# Altium PCB BB_Production.PcbDoc (part 2 of 2)
Units mil, origin at the board's own origin, x right, y up, seen from the top; angles counter-clockwise.
Board outline 3937.01 x 2125.99 mil, 2 copper layers (Top Layer, Bottom Layer), stack 61.811 mil thick; 78 components, 59 nets, 221 pads, 81 vias.
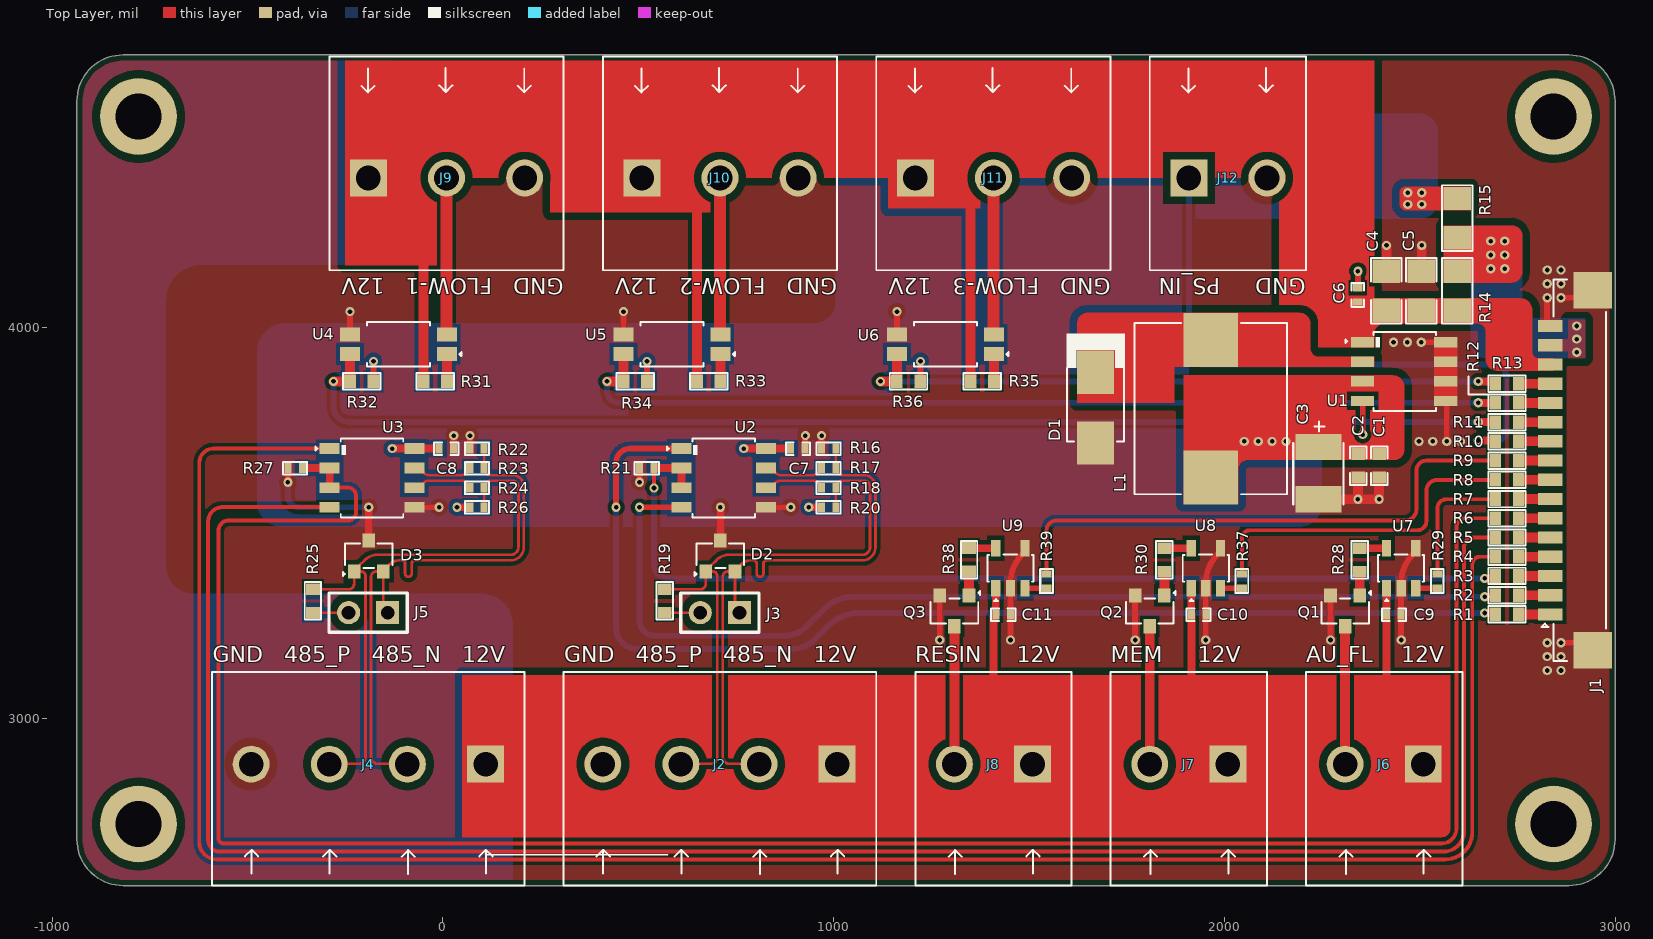
[diagram p0: Top Layer view]

## Part data (continued)
R17 R18 R23 R24: library part RC0402FR-070RL, "RES 0 OHM JUMPER 1/16W 0402", Case Code (Imperial)=0402, Case Code (Metric)=1005, LCSC Part Number=C106231, Manufacturer=Yageo, Max Operating Temperature=155°C, Max Power Dissipation=63mW, Min Operating Temperature=-55°C, Power Rating=62.5mW, Resistor Type="Thick Film", Supplier Part Number 1=603-RC0402FR-070RL, Temperature Coefficient=200ppm/°C, Tolerance=1%, Voltage Rating=50V, Case/Package=0402, ComponentLink1Description=https://datasheet.ciiva.com/8896/pyu-rc0402-51-rohs-l-6-8896149.pdf?src-supplier=Avnet, ComponentLink1URL=https://datasheet.ciiva.com/8896/pyu-rc0402-51-rohs-l-6-8896149.pdf?src-supplier=Avnet, ComponentLink2Description=https://datasheet.ciiva.com/16790/pyu-rc0402-51-rohs-l-6-r-16790444.pdf?src-supplier=Future+Electronics, ComponentLink2URL=https://datasheet.ciiva.com/16790/pyu-rc0402-51-rohs-l-6-r-16790444.pdf?src-supplier=Future+Electronics, Contact Plating=Tin,Matte, Features="Moisture Resistant", Height=0.35mm, Item Type=Resistors, Lead Free="Lead Free", Length=1mm, Manufacturer Part Number=RC0402FR-070RL, Mount="Surface Mount", Number of Terminations=2, Packaging="Tape and Reel", Pricing 1="1=0.10000, 10=0.01400, 50=0.01400, 100=0.00600, 1000=0.00300, 5000=0.00200, 10000=0.00100 (USD)", Radiation Hardening=No, Resistance=0R, RoHS=Yes, RoHS Compliant=Yes, Series=RC, Size Code=0402, Stock 1=8556842, Supplier 1=Mouser, Termination=SMD/SMT, Width=0.5mm
R19 R25: library part RC0603FR-07120RL, "RES 120 OHM 1% 1/10W 0603", Case Code (Imperial)=0603, Case Code (Metric)=1608, LCSC Part Number=C114640, Manufacturer=Yageo, Max Operating Temperature=155°C, Max Power Dissipation=100mW, Min Operating Temperature=-55°C, Package Quantity=1, Resistance Tolerance=1%, Resistor Type="Thick Film", Supplier Part Number 1=311-120HRCT-ND, Temperature Coefficient=100ppm/°C, Voltage Rating=50V, Case/Package=0603, Category="Chip SMD Resistors", ComponentLink1Description=https://datasheet.ciiva.com/2553/pyu-r-int-thick-7-2553512.pdf?src-supplier=Digi-Key, ComponentLink1URL=https://datasheet.ciiva.com/2553/pyu-r-int-thick-7-2553512.pdf?src-supplier=Digi-Key, ComponentLink2Description=https://datasheet.ciiva.com/7746/443971-7746248.pdf?src-supplier=Element14, ComponentLink2URL=https://datasheet.ciiva.com/7746/443971-7746248.pdf?src-supplier=Element14, ComponentLink3Description=https://datasheet.ciiva.com/2553/pyu-r-int-thick-7-2553513.pdf?src-supplier=Digi-Key, ComponentLink3URL=https://datasheet.ciiva.com/2553/pyu-r-int-thick-7-2553513.pdf?src-supplier=Digi-Key, ComponentLink4Description=https://datasheet.ciiva.com/7746/443971-7746249.pdf?src-supplier=Element14, ComponentLink4URL=https://datasheet.ciiva.com/7746/443971-7746249.pdf?src-supplier=Element14, ComponentLink5Description=https://datasheet.ciiva.com/2553/pyu-r-int-thick-7-2553514.pdf?src-supplier=Digi-Key, ComponentLink5URL=https://datasheet.ciiva.com/2553/pyu-r-int-thick-7-2553514.pdf?src-supplier=Digi-Key, ComponentLink6Description=https://datasheet.ciiva.com/46395/443971-46395021.pdf?src-supplier=Element14, ComponentLink6URL=https://datasheet.ciiva.com/46395/443971-46395021.pdf?src-supplier=Element14, Construction=Rectangular, Depth=0.8mm, Features="Moisture Resistant", Height=0.022inch, Item Type=Resistor, Lead Free="Lead Free", Length=1.6mm, Manufacturer Part Number=RC0603FR-07120RL, Military Standard=Not, Number of Pins=2, Number of Terminations=2, Packaging="Tape and Reel", Power Rating=100mW, Pricing 1="1=0.10000, 10=0.02400, 100=0.00970, 1000=0.00436, 2500=0.00378 (USD)", REACH SVHC="No SVHC", Resistance=120R, RoHS=Yes, RoHS Compliant=Yes, Series=RC, Size Code=0603, Stock 1=839061, Supplier 1=Digi-Key, Termination=SMD/SMT, Tolerance=1%, Voltage Rating (DC)=50V, Width=0.031inch
R28 R30 R38: library part RCA0603100RFKEAHP, "RES SMD 100 OHM 1% 1/4W 0603", Case Code (Imperial)=0603, Case Code (Metric)=1608, LCSC Part Number=C2074203, Manufacturer="Vishay Dale", Max Operating Temperature=155°C, Max Power Dissipation=250mW, Min Operating Temperature=-55°C, Resistor Type="Thick Film", Supplier Part Number 1=541-3244-2-ND, Temperature Coefficient=100ppm/°C, Tolerance=1%, Case/Package=0603, ComponentLink1Description=http://www.vishay.com/docs/20067/rcahp.pdf?src-supplier=Digi-Key, ComponentLink1URL=http://www.vishay.com/docs/20067/rcahp.pdf?src-supplier=Digi-Key, Features="Automotive AEC-Q200,Anti-Sulfur", Manufacturer Part Number=RCA0603100RFKEAHP, Number of Terminations=2, Packaging="Tape and Reel", Resistance=100R, RoHS Compliant=Yes, Stock 1=0, Supplier 1=Digi-Key
R29 R37 R39: library part RC0402FR-071KL, "RES 1K OHM 1% 1/16W 0402", Case Code (Imperial)=0402, Case Code (Metric)=1005, LCSC Part Number=C106235, Manufacturer=Yageo, Max Operating Temperature=155°C, Max Power Dissipation=63mW, Min Operating Temperature=-55°C, Power Rating=62.5mW, Resistance=1kR, Resistance Tolerance=1%, Resistor Type="Thick Film", Temperature Coefficient=100ppm/°C, Voltage Rating=50V, Case/Package=0402, Category="Chip SMD Resistors", ComponentLink1Description=https://datasheet.ciiva.com/11819/0900766b80c66297-11819477.pdf?src-supplier=RSComponents, ComponentLink1URL=https://datasheet.ciiva.com/11819/0900766b80c66297-11819477.pdf?src-supplier=RSComponents, ComponentLink2Description=https://datasheet.ciiva.com/7983/1018594-7983502.pdf?src-supplier=Element14, ComponentLink2URL=https://datasheet.ciiva.com/7983/1018594-7983502.pdf?src-supplier=Element14, ComponentLink3Description=https://datasheet.ciiva.com/22747/1018594-22747513.pdf?src-supplier=Element14, ComponentLink3URL=https://datasheet.ciiva.com/22747/1018594-22747513.pdf?src-supplier=Element14, ComponentLink4Description=https://datasheet.ciiva.com/12666/pyu-rc0402-51-rohs-l-6-r-12666741.pdf?src-supplier=Mouser, ComponentLink4URL=https://datasheet.ciiva.com/12666/pyu-rc0402-51-rohs-l-6-r-12666741.pdf?src-supplier=Mouser, ComponentLink5Description=https://datasheet.ciiva.com/7849/1018594-7849869.pdf?src-supplier=Element14, ComponentLink5URL=https://datasheet.ciiva.com/7849/1018594-7849869.pdf?src-supplier=Element14, ComponentLink6Description=https://datasheet.ciiva.com/7849/1018594-7849871.pdf?src-supplier=Element14, ComponentLink6URL=https://datasheet.ciiva.com/7849/1018594-7849871.pdf?src-supplier=Element14, ComponentLink7Description=https://datasheet.ciiva.com/17063/pyu-rc0402-51-rohs-l-6-r-17063193.pdf?src-supplier=Future+Electronics, ComponentLink7URL=https://datasheet.ciiva.com/17063/pyu-rc0402-51-rohs-l-6-r-17063193.pdf?src-supplier=Future+Electronics, Construction=Rectangular, Depth=0.5mm, Features="Moisture Resistant", Height=0.32mm, Item Type=Resistor, Lead Free="Lead Free", Length=1mm, Manufacturer Part Number=RC0402FR-071KL, Military Standard=Not, Number of Pins=2, Number of Terminations=2, Packaging="Tape and Reel", Pricing 1="10000=0.00085, 20000=0.00087, 40000=0.00084, 60000=0.00083, 80000=0.00079, 100000=0.00078, 1000000=0.00076 (USD)", Reach SVHC Compliant=Yes, RoHS=Yes, RoHS Compliant=Yes, Series=RC, Size Code=0402, Stock 1=13030000, Supplier 1=Avnet, Supplier Part Number 1=RC0402FR-071KL, Technology="THICK FILM", Termination=SMD/SMT, Tolerance=1%, Voltage Rating (DC)=50V, Width=0.5mm
R31 R33 R35: library part RC0603FR-072K2L, "RES 2.2K OHM 1% 1/10W 0603", Case Code (Imperial)=0603, Case Code (Metric)=1608, LCSC Part Number=C114662, Manufacturer=Yageo, Max Operating Temperature=155°C, Max Power Dissipation=100mW, Min Operating Temperature=-55°C, Package Quantity=1, Resistance=2.2kR, Resistance Tolerance=1%, Resistor Type="Thick Film", Temperature Coefficient=100ppm/°C, Voltage Rating=50V, Case/Package=0603, Category="Chip SMD Resistors", Construction=Rectangular, Depth=0.8mm, Features="Moisture Resistant", Height=0.022inch, Item Type=Resistor, Lead Free="Lead Free", Length=1.6mm, Manufacturer Part Number=RC0603FR-072K2L, Military Standard=Not, Number of Terminations=2, Packaging="Tape and Reel", Power Rating=100mW, Pricing 1="5000=0.00133, 10000=0.00131, 20000=0.00127 (USD)", RoHS=Yes, RoHS Compliant=Yes, Series=RC, Size Code=0603, Stock 1=733100, Supplier 1=Avnet, Supplier Part Number 1=RC0603FR-072K2L, Termination=SMD/SMT, Tolerance=1%, Width=0.031inch
R32 R34 R36: library part RC0603FR-073K3L, "RES SMD 3.3K OHM 1% 1/10W 0603", Case/Package=0603, LCSC Part Number=C108078, Manufacturer="Yageo Phycomp", Max Operating Temperature=155°C, Min Operating Temperature=-55°C, Power Rating=100mW, Resistance=3.3kR, Supplier Part Number 1=311-3.30KHRCT-ND, Temperature Coefficient=100ppm/°C, Tolerance=1%, Voltage Rating (DC)=50V, Depth=0.8mm, Height=0.45mm, Item Type=Resistor, Lead Free="Lead Free", Length=1.6mm, Manufacturer Part Number=RC0603FR-073K3L, Mount="Surface Mount", Number of Pins=2, Packaging="Cut Tape", Pricing 1="1=0.1, 10=0.024, 100=0.0097, 1000=0.00437, 2500=0.00379 (USD)", REACH SVHC="No SVHC", Stock 1=6863000, Supplier 1=Digi-Key, Width=800um
U1: "IC REG BUCK 3.3V 2A 8SOP", LCSC Part Number=C151823, Manufacturer=Diodes, Supplier Part Number=AP1509-33SGDICT-ND, Category="Voltage Regulators - Switching", ComponentLink1Description=https://datasheet.ciiva.com/2024/ap1509-2024112.pdf?src-supplier=Digi-Key, ComponentLink1URL=https://datasheet.ciiva.com/2024/ap1509-2024112.pdf?src-supplier=Digi-Key, ComponentLink2Description=https://datasheet.ciiva.com/22696/608784-22696879.pdf?src-supplier=Element14, ComponentLink2URL=https://datasheet.ciiva.com/22696/608784-22696879.pdf?src-supplier=Element14, ComponentLink3Description=https://datasheet.ciiva.com/3220/ap1509-3220415.pdf?src-supplier=Avnet, ComponentLink3URL=https://datasheet.ciiva.com/3220/ap1509-3220415.pdf?src-supplier=Avnet, ComponentLink4Description=https://datasheet.ciiva.com/3222/ap1509-3222047.pdf?src-supplier=Avnet, ComponentLink4URL=https://datasheet.ciiva.com/3222/ap1509-3222047.pdf?src-supplier=Avnet, ComponentLink5Description=https://datasheet.ciiva.com/1161/608784-1161659.pdf?src-supplier=Element14, ComponentLink5URL=https://datasheet.ciiva.com/1161/608784-1161659.pdf?src-supplier=Element14, Item Type=IC, Manufacturer Part Number=AP1509-33SG-13, Pricing="1=1.6, 10=1.43, 25=1.3576, 100=1.115, 250=1.04232, 500=0.92112, 1000=0.7272 (USD)", RoHS=Yes, Stock=7160, Supplier=Digi-Key
U2 U3: "SOP-8 RS-485/RS-422 ICs ROHS", LCSC Part Number=C519086, Manufacturer=HGSEMI, Package=SOP-8, ComponentLink1Description=LCSC, ComponentLink1URL=https://www.lcsc.com/product-detail/RS-485-RS-422-ICs_HGSEMI-SP3485EIM-TR_C519086.html, Item Type=IC, Manufacturer Part Number=SP3485EIM/TR
U4 U5 U6: "TransistorOptocouplers DC 1 2500Vrms SOP-4_P1.27 Optocouplers RoHS", LCSC Part Number=C67112, Manufacturer=RENESAS, ComponentLink1Description=LCSC, ComponentLink1URL=https://www.lcsc.com/product-detail/Optocouplers-Phototransistor-Output_RENESAS-PS2801C-1-F3-A_C67112.html, Manufacturer Part Number=PS2801C-1-F3-A
U7 U8 U9: "IC GATE DRVR LOW-SIDE SOT23-5", Case/Package=SOT-23-5, LCSC Part Number=C99395, Manufacturer="Texas Instruments", Max Operating Temperature=140°C, Max Output current=4A, Max Supply Voltage=18V, Min Operating Temperature=-40°C, Min Supply Voltage=4.5V, Operating Supply Voltage=12V, Package Quantity=3000, Channel Type=Single, ComponentLink1Description=http://components.arrow.com/part/dataview/52526194S5756N7713?src-supplier=Arrow+Electronics, ComponentLink1URL=http://components.arrow.com/part/dataview/52526194S5756N7713?src-supplier=Arrow+Electronics, ComponentLink2Description=http://www.ti.com/lit/ds/symlink/ucc27517.pdf?src-supplier=Avnet, ComponentLink2URL=http://www.ti.com/lit/ds/symlink/ucc27517.pdf?src-supplier=Avnet, ComponentLink3Description=http://www.ti.com/lit/ds/symlink/ucc27517.pdf?src-supplier=Digikey, ComponentLink3URL=http://www.ti.com/lit/ds/symlink/ucc27517.pdf?src-supplier=Digikey, ComponentLink4Description=http://www.ti.com/lit/gpn/ucc27517?src-supplier=Mouser, ComponentLink4URL=http://www.ti.com/lit/gpn/ucc27517?src-supplier=Mouser, ComponentLink5Description=http://www.ti.com/general/docs/lit/getliterature.tsp?genericPartNumber=UCC27516&&fileType=pdf&src-supplier=Avnet, ComponentLink5URL=http://www.ti.com/general/docs/lit/getliterature.tsp?genericPartNumber=UCC27516&&fileType=pdf&src-supplier=Avnet, ComponentLink6Description=https://www.verical.com/server-webapp/html/getDatasheet?partID=482756&src-supplier=Verical, ComponentLink6URL=https://www.verical.com/server-webapp/html/getDatasheet?partID=482756&src-supplier=Verical, Fall Time=11ns, Height=1.45mm, Item Type=IC, Lead Free="Lead Free", Length=2.9mm, Manufacturer Part Number=UCC27517DBVR, Mounting Technology="Surface Mount", Number of Channels=1, Number of Drivers=1, Number of Outputs=1, Output Current=4A, Packaging="Tape and Reel", Pins=5, Pricing="1=0.77, 10=0.646, 50=0.646, 100=0.501, 1000=0.346, 10000=0.29 (USD)", Propagation Delay=30ns, Radiation Hardening=No, Rise Time=22ns, RoHS=Yes, RoHS Compliant=Yes, Series=-, Stock=71094, Supplier=Mouser, Thickness=1.2mm, Turn-On Delay Time=30ns, Width=1.6mm

## Free pads (board coordinates)
  round 196.85 hole 118.11: MH(-779.53,2729.13) MH(-779.53,4540.16) MH(2842.52,2729.13) MH(2842.52,4540.16)

## Via types
v1: diameter 23.62, hole 11.81, Top Layer to Bottom Layer, tented both sides, 81 vias

## Nets (pads, with @x,y where several pads share a name; then routed paths per layer and width w, separated by ;. In a path a pad name is that pad's centre, name@x,y a point inside that pad or via, vN(x,y) a via of type N, cw(c..) or ccw(c..) an arc to the next point about the centre after c; other vN are vias at no path point)
3V3: C1.2 C2.2 C3.1 C7.2 C8.2 L1.2 R15.1 R20.1 R26.1 R32.2 R34.2 R36.2 U1.3 U2.8 U3.8 | length 449.4
  Top Layer w15: R32.2 -178.03,3913.11 v1(-177.92,3913.22) ; R34.2 521.97,3913.11 v1(522.08,3913.22) ; R36.2@1221.97,3861.93 1221.97,3913.11 v1(1222.08,3913.22)
  Top Layer w20: v1(-130,3690) U3.8 C8.2@-15,3690 ; v1(36,3540) R26.1@66.17,3540 ; v1(770,3690) U2.8 ; U2.8@821.7,3690 U2.8 ; C7.2@885,3690 U2.8 ; v1(936,3540) R20.1@966.17,3540
  other v1: 2050.97,3708.47 2086.47,3708.47 2121.97,3708.47 2157.47,3708.47 2469.5,4315 2505,4315 2469.5,4344.5 2505,4344.5
485-3_N: R17.1 U2.7 | length 154.8
  Top Layer w7: U2.7 848.79,3630.65 ccw(c864.17,3640) 864.17,3622 946.76,3622 ccw(c946.76,3640) 959.89,3627.69 963,3631 R17.1
485-3_P: R18.1 U2.6 | length 155.2
  Top Layer w7: U2.6 848.76,3600.28 cw(c863.53,3590) 863.53,3608 948,3608 cw(c948,3590) 963.59,3599 R18.1
485-4_N: R23.1 U3.7 | length 154.8
  Top Layer w7: U3.7 -51.21,3630.65 ccw(c-35.83,3640) -35.83,3622 46.76,3622 ccw(c46.76,3640) 59.89,3627.69 63,3631 R23.1
485-4_P: R24.1 U3.6 | length 155.2
  Top Layer w7: U3.6 -51.24,3600.28 cw(c-36.47,3590) -36.47,3608 48,3608 cw(c48,3590) 63.59,3599 R24.1
AUTO_FLUSH: J6.2 Q1.3 | length 353.2
  Top Layer w25: J6.2 Q1.3
DR_485_3: R3.1 R21.1 U2.2 U2.3 | length 2536.4
  Top Layer w10: v1(540,3589.24) R21.1
  Top Layer w20: R21.1@543.27,3640 U2.2 U2.3 ; v1(2666.04,3357.71) R3.1@2692.86,3357.71 ; R3.1@2692.86,3363.85 R3.1@2693.16,3364.14
  Bottom Layer w15: v1(540,3589.24) 540,3395.06 ccw(c577.35,3395.06) 577.35,3357.71 v1(2666.04,3357.71)
DR_485_4: R6.1 R27.1 U3.2 U3.3 | length 5487.6
  Top Layer w10: U3.3 -242.84,3590 cw(c-242.84,3569.65) -222.5,3569.65 -222.5,3526.22 cw(c-242.72,3526.22) -242.72,3506 -548,3506 ccw(c-548,3479) -575,3479 -575,2692.99 ccw(c-561.42,2692.99) -561.42,2679.41 2556.14,2679.41 ccw(c2556.14,2717.02) 2593.75,2717.02 2593.75,3490.02 cw(c2615.35,3490.02) 2615.35,3511.62 R6.1
  Top Layer w20: R27.1@-356.73,3640 U3.2 U3.3
FLOW_1: J9.2 U4.2 | length 401.3
  Top Layer w15: U4.2@8.97,3982.96 ccw(c10,3982.96) U4.2
  Top Layer w30: U4.2@8.97,3982.96 J9.2
FLOW_2: J10.2 U5.2 | length 401.3
  Top Layer w15: U5.2@708.97,3982.96 ccw(c710,3982.96) U5.2
  Top Layer w30: U5.2@708.97,3982.96 J10.2
FLOW_3: J11.2 U6.2 | length 401.3
  Top Layer w15: U6.2@1408.97,3982.96 ccw(c1410,3982.96) U6.2
  Top Layer w30: U6.2@1408.97,3982.96 J11.2
FLOW_MCU1: R11.1 R32.1 U4.4 | length 3172.6
  Top Layer w15: v1(2649.44,3758.01) v1@2649.6,3757.85
  Top Layer w20: v1@2649.6,3757.85 R11.1@2693.15,3757.85
  Top Layer w25: v1(-280.33,3861.93) R32.1 U4.4
  Bottom Layer w15: v1(-280.33,3861.93) -280.33,3798.08 ccw(c-240.27,3798.08) -240.27,3758.01 v1(2649.44,3758.01)
FLOW_MCU2: R12.1 R34.1 U5.4 | length 2427.5
  Top Layer w15: v1(2649.43,3807.22) v1@2649.6,3807.06
  Top Layer w20: v1@2649.6,3807.06 R12.1@2693.15,3807.06
  Top Layer w25: v1(419.67,3861.93) R34.1 U5.4
  Bottom Layer w15: v1(419.67,3861.93) 419.67,3837.61 ccw(c450.06,3837.61) 450.06,3807.22 v1(2649.43,3807.22)
FLOW_MCU3: R13.1 R36.1 U6.4 | length 1685.6
  Top Layer w20: v1(2649.43,3861.92) R13.1@2692.98,3861.92
  Top Layer w25: v1(1119.67,3861.92) R36.1 1161.97,3861.92 U6.4
  Bottom Layer w15: v1(1119.67,3861.92) v1(2649.43,3861.92)
FLUSH_CNTRL: R7.1 R29.1 | length 329.4
  Top Layer w10: R29.1 2545,3536.47 cw(c2568.94,3536.47) 2568.94,3560.41 2693.33,3560.41 R7.1
GND: C1.1 C2.1 C3.2 C4.1 C5.1 C6.1 C7.1 C8.1 C9.1 C10.1 C11.1 D1.1 D2.3 D3.3 J1.16 J1.MP1 J1.MP2 J2.4 J4.4 J9.3 J10.3 J11.3 J12.2 Q1.2 Q2.2 Q3.2 R16.2 R21.2 R22.2 R27.2 U1.4 U1.5 U1.6 U1.7 U1.8 U2.5 U3.5 U4.3 U5.3 U6.3 U7.2 U7.4 U8.2 U8.4 U9.2 U9.4 | length 2968.9
  Top Layer w15: v1(-397,3603.78) R27.2@-397,3639 ; U4.3 v1(-238.03,4040.63) ; U3.5 v1(-10,3540) ; C8.1 27,3723.28 v1(27.5,3723.28) ; R22.2 v1@68.5,3723.28 ; U5.3 v1(461.97,4040.63) ; v1(503,3603.78) R21.2@503,3639 ; U2.5 v1(890,3540) ; C7.1 927,3723.28 v1(927.5,3723.28) ; R16.2 v1@968.5,3723.28 ; U6.3 v1(1161.97,4040.63) ; v1(1271.57,3200) Q3.2 ; v1(1452.4,3200) C11.1 U9.2 1452.41,3346.68 cw(c1557.69,3345.53) 1485.49,3422.17 U9.4 ; v1(1771.56,3200) Q2.2 ; v1(1952.39,3200) C10.1 U8.2 1952.4,3346.68 cw(c2057.69,3345.53) 1985.49,3422.17 U8.4 ; v1(2271.57,3200) Q1.2 ; C6.1 2341.76,4101.65 v1(2341.76,4144.15) ; v1(2353.98,3725.73) U1.4 ; C4.1 C4.1@2415,4145.22 ; v1(2452.4,3200) C9.1 U7.2 2452.4,3346.68 cw(c2557.69,3345.53) 2485.49,3422.17 U7.4 ; v1(2503.93,3962.15) U1.8 ; U1.5 cw(c2566.58,3809.8) 2568.94,3809.8 v1(2568.94,3708.47) ; v1(2826.13,4076.15) 2826.13,4011.61 ccw(c2833.99,4011.61) J1.16 ; v1(2861.63,3193.14) 2923.53,3193.14 cw(c2923.53,3174.02) J1.MP1 ; v1(2861.63,4076.15) 2923.53,4076.15 ccw(c2923.53,4095.28) J1.MP2
  Top Layer w20: D3.3 v1(-190,3540) ; D2.3 v1(710,3540)
  Top Layer w25: C3.2 v1(2341.63,3560.41) ; C2.1@2341.63,3615.21 v1(2341.63,3560.41) ; C1.1 v1(2395.93,3560.41) v1(2341.63,3560.41) ; C4.1@2415,4145.22 v1(2415,4210) ; C5.1@2505,4145.22 v1(2505,4210)
  Bottom Layer w15: v1(-397,3603.78) -397,3567.89 ccw(c-369.11,3567.89) -369.11,3540 v1(-190,3540)
  other v1: 2826.13,3122.14 2861.63,3122.14 2826.13,3157.64 2861.63,3157.64 2826.13,3193.14 2497.94,3708.47 2533.44,3708.47 2604.44,3708.47 69,3723.28 969,3723.28 2432.93,3962.15 2468.43,3962.15 2826.13,4111.65 2861.63,4111.65 2826.13,4147.15 2861.63,4147.15
MEM_CNTRL: R8.1 R37.1 | length 858.4
  Top Layer w10: R37.1 2045,3461 cw(c2065,3461) 2065,3481 2494,3481 ccw(c2494,3504) 2517,3504 2517,3582.04 cw(c2545,3582.04) 2545,3610.04 R8.1
MEM_SAVER: J7.2 Q2.3 | length 353.2
  Top Layer w25: J7.2 Q2.3
NetD1_2: D1.2 L1.1 U1.2
NetJ1_1: J1.1 R1.2 | length 80.7
  Top Layer w25: R1.2 J1.1
NetJ1_2: J1.2 R2.2 | length 80.7
  Top Layer w25: R2.2 J1.2
NetJ1_3: J1.3 R3.2 | length 80.7
  Top Layer w25: R3.2 J1.3
NetJ1_4: J1.4 R4.2 | length 80.7
  Top Layer w25: R4.2 J1.4
NetJ1_5: J1.5 R5.2 | length 80.7
  Top Layer w25: R5.2 J1.5
NetJ1_6: J1.6 R6.2 | length 80.7
  Top Layer w25: R6.2 J1.6
NetJ1_7: J1.7 R7.2 | length 80.7
  Top Layer w25: R7.2 J1.7
NetJ1_8: J1.8 R8.2 | length 80.7
  Top Layer w25: R8.2 J1.8
NetJ1_9: J1.9 R9.2 | length 80.7
  Top Layer w25: R9.2 J1.9
NetJ1_10: J1.10 R10.2 | length 80.7
  Top Layer w25: R10.2 J1.10
NetJ1_11: J1.11 R11.2 | length 80.7
  Top Layer w25: R11.2 J1.11
NetJ1_12: J1.12 R12.2 | length 80.7
  Top Layer w25: R12.2 J1.12
NetJ1_13: J1.13 R13.2 | length 80.7
  Top Layer w25: R13.2 J1.13
NetJ1_15: J1.15 R14.2 R15.2
  other v1: 2901.92,3936.57 2901.92,3970.15 2901.92,4003.74 2681.86,4150 2717.36,4150 2681.86,4185.5 2717.36,4185.5 2681.86,4221 2717.36,4221
NetJ3_2: J3.2 R19.2 | length 91.8
  Top Layer w7: R19.2@567.21,3270.47 R19.2 J3.2
NetJ5_2: J5.2 R25.2 | length 91.8
  Top Layer w7: R25.2@-332.79,3270.47 R25.2 J5.2
NetQ1_1: Q1.1 R28.2 | length 60.7
  Top Layer w25: Q1.1 R28.2
NetQ2_1: Q2.1 R30.2 | length 60.7
  Top Layer w25: Q2.1 R30.2
NetQ3_1: Q3.1 R38.2 | length 60.7
  Top Layer w25: Q3.1 R38.2@1346.37,3374.89
NetR28_1: R28.1 U7.5 | length 68.6
  Top Layer w20: R28.1 U7.5
NetR29_2: R29.2 U7.3 | length 55.2
  Top Layer w15: U7.3 R29.2
NetR30_1: R30.1 U8.5 | length 68.6
  Top Layer w20: R30.1 U8.5
NetR31_2: R31.2 U4.1 | length 70
  Top Layer w25: R31.2 U4.1
NetR33_2: R33.2 U5.1 | length 70
  Top Layer w25: R33.2 U5.1
NetR35_2: R35.2 U6.1 | length 70
  Top Layer w25: R35.2@1410,3861.92 U6.1
NetR37_2: R37.2 U8.3 | length 55.2
  Top Layer w15: U8.3 R37.2
NetR38_1: R38.1 U9.5 | length 68.6
  Top Layer w20: R38.1@1346.37,3434.89 U9.5
NetR39_2: R39.2 U9.3 | length 55.2
  Top Layer w15: U9.3 R39.2
PS_IN: J12.1 R10.1 | length 1563
  Top Layer w15: v1@2649.44,3708.8 v1@2649.61,3708.63
  Top Layer w20: v1(2649.44,3710.8) R10.1@2692.99,3710.8
  Bottom Layer w15: J12.1 1908.97,3942.35 ccw(c1946.22,3942.35) 1946.22,3905.11 2689.41,3905.11 cw(c2689.41,3872.37) 2722.15,3872.37 2722.15,3733.08 ; v1@2649.52,3710.72 2697.78,3710.72 ccw(c2697.78,3735.08) 2722.15,3735.08
RESIN_SAVER: J8.2 Q3.3 | length 353.2
  Top Layer w25: J8.2 Q3.3
RS485-3_N: D2.2 J2.2 J3.1 R16.1 R17.2 | length 1507
  Top Layer w7: J3.1 cw(c758.5,3281.1) 747.4,3281.1 D2.2 ; J2.2@808.97,2883.11 733.38,2883.11 cw(c733.38,2900.52) 715.97,2900.52 715.97,3361.77 cw(c729.83,3361.77) 729.83,3375.63 D2.2 ; R17.2 ccw(c1023.5,3640) 1023.5,3622 1077,3622 cw(c1077,3592) 1107,3592 1107,3438 cw(c1072.96,3438) 1072.96,3403.96 848.26,3403.96 828.54,3403.96 ccw(c828.54,3395.46) 820.04,3395.46 820.04,3370.12 cw(c811.54,3370.12) 803.04,3370.12 803.04,3395.46 ccw(c794.54,3395.46) 794.54,3403.96 787.55,3403.96 777.54,3402.46 ccw(c787.55,3369.73) 774.04,3401.18 ccw(c787.55,3369.73) 763.36,3393.95 760.04,3390.63 760.04,3388.27 D2.2 ; R17.2@1005.5,3642.1 R16.1
RS485-3_P: D2.1 J2.3 R18.2 R19.1 R20.2 | length 1507
  Top Layer w7: R19.1 659.16,3330 ccw(c659.16,3343.44) 672.6,3343.44 D2.1 672.6,3377.6 685.24,3390.24 685.16,3375.63 689.82,3375.63 cw(c689.82,3363.48) 701.97,3363.48 ; J2.3@608.97,2883.11 684.56,2883.11 ccw(c684.56,2900.52) 701.97,2900.52 701.97,3361.77 ; D2.1@685.58,3390.24 700.6,3405.26 ; 700.61,3405.27 cw(c731.26,3374.59) 731.26,3417.96 1072.96,3417.96 ccw(c1072.96,3438) 1093,3438 1093,3592 ccw(c1077,3592) 1077,3608 1041.61,3608 1023.5,3608 ccw(c1023.5,3590) R18.2 R20.2
RS485-4_N: D3.2 J4.2 J5.1 R22.1 R23.2 | length 1507
  Top Layer w7: J5.1 cw(c-141.5,3281.1) -152.6,3281.1 D3.2 ; J4.2@-91.03,2883.11 -166.62,2883.11 cw(c-166.62,2900.52) -184.03,2900.52 -184.03,3361.77 cw(c-170.17,3361.77) -170.17,3375.63 D3.2 ; R23.2 ccw(c123.5,3640) 123.5,3622 177,3622 cw(c177,3592) 207,3592 207,3438 cw(c172.96,3438) 172.96,3403.96 -51.74,3403.96 -71.46,3403.96 ccw(c-71.46,3395.46) -79.96,3395.46 -79.96,3370.12 cw(c-88.46,3370.12) -96.96,3370.12 -96.96,3395.46 ccw(c-105.46,3395.46) -105.46,3403.96 -112.45,3403.96 -122.46,3402.46 ccw(c-112.45,3369.73) -125.96,3401.18 ccw(c-112.45,3369.73) -136.64,3393.95 -139.96,3390.63 -139.96,3388.27 D3.2 ; R23.2@105.5,3642.1 R22.1
RS485-4_P: D3.1 J4.3 R24.2 R25.1 R26.2 | length 1507
  Top Layer w7: R25.1 -240.84,3330 ccw(c-240.84,3343.44) -227.4,3343.44 D3.1 -227.4,3377.6 -214.76,3390.24 -214.84,3375.63 -210.18,3375.63 cw(c-210.18,3363.48) -198.03,3363.48 ; J4.3@-291.03,2883.11 -215.44,2883.11 ccw(c-215.44,2900.52) -198.03,2900.52 -198.03,3361.77 ; D3.1@-214.42,3390.24 -199.4,3405.26 ; -199.39,3405.27 cw(c-168.74,3374.59) -168.74,3417.96 172.96,3417.96 ccw(c172.96,3438) 193,3438 193,3592 ccw(c177,3592) 177,3608 141.61,3608 123.5,3608 ccw(c123.5,3590) R24.2 R26.2
RS_CNTRL: R9.1 R39.1 | length 1404.2
  Top Layer w10: R39.1 1545,3481.17 cw(c1569.65,3481.17) 1569.65,3505.82 2462.92,3505.82 ccw(c2462.92,3534.28) 2491.38,3534.28 2491.38,3633.47 cw(c2517.16,3633.47) 2517.16,3659.25 R9.1
SR_RX3: R1.1 U2.1 | length 2922.5
  Top Layer w15: v1(443,3540) 443,3653.78 cw(c479.22,3653.78) 479.22,3690 U2.1
  Top Layer w20: v1@2666.04,3269.42 2692.86,3269.42 R1.1@2693.16,3269.72
  Bottom Layer w15: v1@443,3540.88 443,3231 ccw(c497,3231) 497,3177 893.06,3177 ccw(c893.06,3258.94) 951,3201 986.68,3236.68 cw(c1065.4,3157.96) 1065.4,3269.29 v1(2666.04,3269.29)
SR_RX4: R4.1 U3.1 | length 5406.5
  Top Layer w10: U3.1@-288.01,3690 U3.1 -587.28,3690 ccw(c-587.28,3653.35) -623.93,3653.35 -623.93,2683.2 ccw(c-579.14,2683.2) -579.14,2638.41 2564.69,2638.41 ccw(c2564.69,2708.04) 2634.31,2708.04 2634.31,3394 cw(c2653.51,3394) 2653.51,3413.19 R4.1
SR_TX3: R2.1 U2.4 | length 2643.5
  Top Layer w15: v1(503,3540) U2.4
  Top Layer w20: v1@2666.51,3310.77 R2.1@2692.99,3310.77 ; R2.1@2692.86,3310.63 R2.1@2692.99,3310.77 ; R2.1@2693.16,3310.93 R2.1@2692.99,3310.77 ; R2.1@2693.33,3310.77 R2.1@2692.99,3310.77
  Bottom Layer w15: v1(503,3540) 503,3249.72 ccw(c541.72,3249.72) 541.72,3211 873.04,3211 873.1,3211 ccw(c873.1,3293.23) 931.25,3235.09 976.3,3280.14 cw(c1049.92,3206.52) 1049.92,3310.63 v1(2666.51,3310.63)
SR_TX4: R5.1 U3.4 | length 5230.8
  Top Layer w10: U3.4 -565.1,3540 ccw(c-565.1,3504.17) -600.93,3504.17 -600.93,2687.2 ccw(c-572.14,2687.2) -572.14,2658.41 2560.14,2658.41 ccw(c2560.14,2712.02) 2613.75,2712.02 2613.75,3440.44 cw(c2635.72,3440.44) 2635.72,3462.4 R5.1
VCC_12V: C4.2 C5.2 C6.2 C9.2 C10.2 C11.2 J1.14 J2.1 J4.1 J6.1 J7.1 J8.1 J9.1 J10.1 J11.1 R14.1 R31.1 R33.1 R35.1 U1.1 U7.1 U8.1 U9.1 | length 2314.2
  Top Layer w20: C11.2@1415,3265 U9.1 ; C11.2 1408.97,3258.57 1408.97,3062.3 1414.83,3056.45 1420.69,3050.59 1428.97,3050.59 1508.97,3050.59 ; C10.2@1915,3265 U8.1 ; C10.2 1915.39,3071.26 ccw(c1984.94,3071.26) 1943.99,3015.05 ; 2415,3093.93 2415,3129.16 U7.1 ; 2442.55,3050.59 2508.97,3050.59
  Top Layer w25: -74.32,4243.14 cw(c-133.04,4184.42) -50,4184.46 -50,4184.35 R31.1 ; R33.1 650,4320.41 ; R35.1@1350,3861.92 1350,4188.29 1350,4188.41 1350,4320.41

## Polygon pours and split planes (outlines as drawn)
GND on Top Layer "NONET_L-01_P-001" (solid, remove dead copper, pour order 8): -937.01,2571.65 -937.01,4697.64 3000,4697.64 3000,2571.65
NetJ1_15 on Top Layer "NONET_L-01_P-001" (solid, pour order 3): 2923.53,4019.49 2880.31,4019.49 2880.31,3970.28 2802.1,3970.28 2802.1,3938.78 2880.31,3938.78 2880.31,3921.06 2923.53,3921.06
GND on Bottom Layer "NONET_L-01_P-001" (solid, remove dead copper, pour order 5): -937.01,2571.65 -937.01,4697.64 3000,4697.64 3000,2571.65

## Other copper
Top Layer:
  rectangle net GND: 2537.05,3799.16 2596.11,3975.14
  region net NetD1_2: 2130,4037.24 2192.77,4037.24 cw(c2192.77,4010) 2220,4010 2220,3947.24 ccw(c2242.09,3947.24) 2242.09,3925.14 2383.51,3925.14 2383.51,3899.16 2003.37,3899.16 1872,3899.16 1872,3807.22 1623.22,3807.22 1623.22,4013.79 1624.22,4018.81 1626.19,4023.55 1629.03,4027.81 1632.65,4031.43 1636.92,4034.28 1641.65,4036.24 1646.67,4037.24 1649.24,4037.24
  region net 3V3: 2631.11,4300 2460.2,4300 2455.03,4302.14 2451.08,4306.1 2448.93,4311.27 2448.93,4314.07 2448.93,4347.5 2448.93,4349.99 2450.84,4354.58 2454.35,4358.1 2458.95,4360 2631.11,4360
  region net NetJ1_15: 2736.39,4260 2741.45,4260 2750.81,4256.12 2757.98,4248.96 2761.85,4239.6 2761.85,4234.53 2761.86,4141.54 2761.85,4141.54 2761.85,4138.84 2760.8,4133.55 2758.74,4128.56 2755.74,4124.08 2751.93,4120.27 2747.44,4117.27 2742.46,4115.21 2737.17,4114.15 2734.47,4114.15 2561.11,4114.15 2561.11,4260 2736.39,4260
  region net VCC_12V: 195 vertices and 1 holes, not listed, extent 49.92,2694.59 2578.57,3109.64
  region net VCC_12V: 2758.16,4074.15 2761.86,4074 2766.86,4073.01 2772.29,4070.76 2777.18,4067.49 2781.34,4063.34 2784.6,4058.45 2786.85,4053.02 2788,4047.26 2788,4044.32 2788,3992.32 2788,3970.28 2788,3938.92 2788.34,3935.43 2791,3929 2795.93,3924.07 2802.37,3921.41 2805.85,3921.06 2839.2,3921.06 2841.21,3920.66 2841.21,3889.57 2695.15,3889.57 2689.57,3890.68 2684.31,3892.86 2679.58,3896.02 2675.56,3900.04 2672.4,3904.77 2670.22,3910.03 2669.11,3915.61 2669.11,3987.99 2668.69,3992.32 2665.38,4000.3 2659.26,4006.42 2651.28,4009.73 2646.95,4010.15 2410.15,4010.15 2407.54,4010.02 2402.42,4009.01 2397.59,4007.01 2393.25,4004.11 2389.56,4000.41 2386.66,3996.07 2384.66,3991.24 2383.64,3986.12 2383.51,3983.51 2383.51,3949.16 2300,3949.16 2300,4055.33 2303.58,4063.96 2310.19,4070.58 2318.83,4074.15 2758.16,4074.15
  region net VCC_12V: 220 vertices and 1 holes, not listed, extent -250.08,3949.16 2383.51,4682.34
  region net 3V3: 2431.41,3877.14 2435.32,3876.93 2439.83,3876.03 2445.09,3873.86 2449.82,3870.7 2453.84,3866.68 2457,3861.95 2459.17,3856.69 2460.28,3851.12 2460.28,3848.27 2460.28,3686.98 2460.28,3684.4 2459.28,3679.34 2457.3,3674.58 2454.44,3670.29 2450.79,3666.65 2446.51,3663.78 2441.74,3661.81 2436.68,3660.8 2434.11,3660.8 2059.8,3660.8 2055.03,3660.33 2046.22,3656.68 2039.47,3649.94 2035.82,3641.12 2035.35,3636.35 2035.35,3549.08 1895.59,3549.08 1895.59,3877.14 hole: 2393.51,3835.14 2314.46,3835.14 2314.46,3789.16 2336.14,3789.16 2336.14,3738.73 2335.49,3738.09 2332.17,3730.07 2332.17,3721.39 2335.49,3713.38 2341.63,3707.24 2349.64,3703.92 2358.32,3703.92 2366.34,3707.24 2372.47,3713.38 2375.79,3721.39 2375.79,3730.07 2372.47,3738.09 2371.83,3738.73 2371.83,3789.16 2393.51,3789.16
Bottom Layer:
  region net NetJ1_15: 2737.85,4260 2737.86,4260 2741.55,4259.82 2744.48,4259.23 2749.59,4257.11 2751.5,4255.84 2752.87,4254.93 2756.78,4251.02 2758.97,4247.74 2761.09,4242.63 2761.47,4240.68 2761.85,4238.77 2761.85,4236 2761.85,4053.15 2762,4050.19 2762.76,4046.36 2763.15,4044.39 2765.41,4038.93 2768.7,4034.02 2772.88,4029.84 2777.79,4026.56 2783.25,4024.3 2789.05,4023.14 2792,4023 2792.74,4023 2923.53,4023 2923.53,3923 2689.72,3923 2689.41,3923.04 2689.41,3923 2663.57,3923 2660.27,3923 2653.78,3924.29 2647.67,3926.82 2642.17,3930.49 2637.49,3935.17 2635.42,3938.28 2633.82,3940.67 2633.05,3942.52 2633.05,3942.53 2631.29,3946.78 2630.39,3951.3 2630,3953.27 2630,4078.36 2630,4233.73 2630.26,4237.62 2631.01,4241.39 2632.99,4246.17 2634.11,4247.84 2635.86,4250.47 2637.28,4251.89 2637.28,4251.9 2639.52,4254.13 2642.16,4255.89 2643.83,4257.01 2645.68,4257.78 2648.61,4258.99 2653.68,4260 2655.69,4260 2715.6,4260 2737.85,4260
  region net VCC_12V: 117 vertices and 5 holes, not listed, extent -921.71,2586.95 178,4682.34
  region net 3V3: 294 vertices and 9 holes, not listed, extent -476,3490 2546.27,4547.24

## Silkscreen, mask and mechanical layers (free items; w line width, h text height)
Top Overlay:
  lines w5: 108.97,2650.39 575,2650.39 ; 2624.48,3874 2624.48,3827.89 2675.32,3827.89
  text "GND   FLOW-1   12V" at 308.97,4140.16 h70 r180
  text "GND   FLOW-2   12V" at 1008.97,4140.16 h70 r180
  text "GND   FLOW-3   12V" at 1708.97,4140.16 h70 r180
  text "GND     PS_IN" at 2208.82,4140.16 h70 r180
  text "GND   485_P   485_N   12V" at -589.59,3129.33 h70
  text "GND   485_P   485_N   12V" at 310.41,3129.33 h70
  text "RESIN     12V" at 1208.97,3129.33 h70
  text "MEM     12V" at 1708.97,3129.33 h70
  text "AU_FL    12V" at 2208.97,3129.33 h70
Bottom Overlay:
  text "BB PRODUCTION_v1.0" at -897.67,3217 h50 r270
Board Outline:
  the board outline again, w10
Fabrication:
  drawing of 191 lines, arcs and shapes, not listed
  text "Layer" at 3757.58,4603 h60
  text "Name" at 4167.49,4603 h60
  text "Material" at 5097.23,4603 h60
  text "Thickness" at 5957,4603 h60
  text "Constant" at 6606.84,4603 h60
  text "Board Layer Stack" at 7176.7,4603 h60
  text "Top Overlay" at 4167.49,4483 h60
  text "Top Solder" at 4167.49,4363 h60
  text "Solder Resist" at 5097.23,4363 h60
  text "0.010mm" at 5957,4363 h60
  text "3.5" at 6606.84,4363 h60
  text "1" at 3757.58,4243 h60
  text "Top Layer" at 4167.49,4243 h60
  text "0.035mm" at 5957,4243 h60
  text "Dielectric 1" at 4167.49,4123 h60
  text "FR-4" at 5097.23,4123 h60
  text "1.500mm" at 5957,4123 h60
  text "4.6" at 6606.84,4123 h60
  text "2" at 3757.58,4003 h60
  text "Bottom Layer" at 4167.49,4003 h60
  text "0.035mm" at 5957,4003 h60
  text "Bottom Solder" at 4167.49,3883 h60
  text "Solder Resist" at 5097.23,3883 h60
  text "0.010mm" at 5957,3883 h60
  text "3.5" at 6606.84,3883 h60
  text "Bottom Overlay" at 4167.49,3763 h60
  text "Total board thickness:" at 3757.58,3643 h60
  text "1.590mm" at 5957,3643 h60
Drill Drawing:
  circle w10: c-888.38,6000.83 r33.33
  lines w10: -921.71,5534.17 -905.04,5534.17 -888.38,5517.5 -871.71,5534.17 -855.04,5534.17 -871.71,5550.83 -855.04,5567.5 -871.71,5567.5 -888.38,5584.17 -905.04,5567.5 -921.71,5567.5 -905.04,5550.83 -921.71,5534.17 ; -921.71,5667.5 -855.04,5667.5 -855.04,5734.17 -921.71,5734.17 -921.71,5667.5 ; -921.71,5884.17 -855.04,5884.17 -888.38,5817.5 -921.71,5884.17
  lines w15: -981.5,5472.5 6138.56,5472.5 ; -981.5,6072.5 6138.56,6072.5 ; -430.62,5322.5 -430.62,6222.5 ; 149.22,5322.5 149.22,6222.5 ; 1268.9,5322.5 1268.9,6222.5 ; 1774.77,5322.5 1774.77,6222.5 ; 2508.57,5322.5 2508.57,6222.5 ; 4008.13,5322.5 4008.13,6222.5 ; 4597.97,5322.5 4597.97,6222.5 ; 5343.77,5322.5 5343.77,6222.5 ; -981.5,5322.5 6138.56,5322.5 6138.56,6222.5 -981.5,6222.5 -981.5,5322.5
  text "Symbol" at -891.5,6117.5 h72
  text "Count" at -385.62,6117.5 h72
  text "Hole Size" at 194.22,6117.5 h72
  text "Plated" at 1313.9,6117.5 h72
  text "Hole Type" at 1819.77,6117.5 h72
  text "Drill Layer Pair" at 2553.57,6117.5 h72
  text "Via/Pad" at 4053.13,6117.5 h72
  text "Pad Shape" at 4642.97,6117.5 h72
  text "Template" at 5388.77,6117.5 h72
  text "4" at -385.62,5967.5 h60
  text "35.43mil (0.900mm)" at 194.22,5967.5 h60
  text "PTH" at 1313.9,5967.5 h60
  text "Round" at 1819.77,5967.5 h60
  text "Top Layer - Bottom Layer" at 2553.57,5967.5 h60
  text "Pad" at 4053.13,5967.5 h60
  text "(Mixed)" at 4642.97,5967.5 h60
  text "(Mixed)" at 5388.77,5967.5 h60
  text "4" at -385.62,5817.5 h60
  text "118.11mil (3.000mm)" at 194.22,5817.5 h60
  text "PTH" at 1313.9,5817.5 h60
  text "Round" at 1819.77,5817.5 h60
  text "Top Layer - Bottom Layer" at 2553.57,5817.5 h60
  text "Pad" at 4053.13,5817.5 h60
  text "Rounded" at 4642.97,5817.5 h60
  text "c500h300" at 5388.77,5817.5 h60
  text "25" at -385.62,5667.5 h60
  text "62.99mil (1.600mm)" at 194.22,5667.5 h60
  text "PTH" at 1313.9,5667.5 h60
  text "Round" at 1819.77,5667.5 h60
  text "Top Layer - Bottom Layer" at 2553.57,5667.5 h60
  text "Pad" at 4053.13,5667.5 h60
  text "Rounded" at 4642.97,5667.5 h60
  text "(Mixed)" at 5388.77,5667.5 h60
  text "81" at -385.62,5517.5 h60
  text "11.81mil (0.300mm)" at 194.22,5517.5 h60
  text "PTH" at 1313.9,5517.5 h60
  text "Round" at 1819.77,5517.5 h60
  text "Top Layer - Bottom Layer" at 2553.57,5517.5 h60
  text "Via" at 4053.13,5517.5 h60
  text "Rounded" at 4642.97,5517.5 h60
  text "v60h30m0mx0" at 5388.77,5517.5 h60
  text "114 Total" at -385.62,5367.5 h60

## Dimensions
2881.89,4697.64 to 2881.89,2571.65 on Dimensions
-937.01,4579.53 to 3000,4579.53 on Dimensions